# Altium PCB ESP32C3N.PcbDoc
Units mm, origin at the board's own origin, x right, y up, seen from the top; angles counter-clockwise.
Board outline 20 x 20 mm, 2 copper layers (Top Layer, Bottom Layer), stack 0.77 mm thick; 26 components, 22 nets, 95 pads, 37 vias.
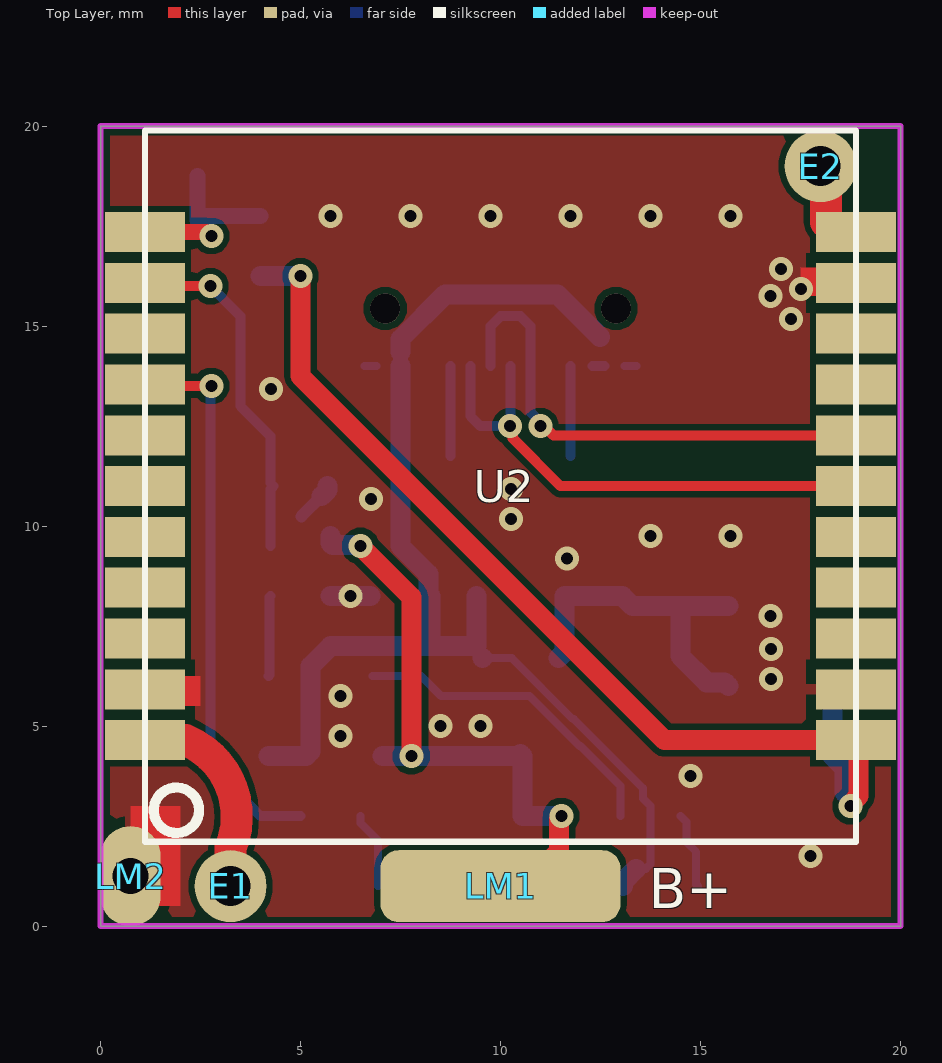
[diagram p0: Top Layer view]
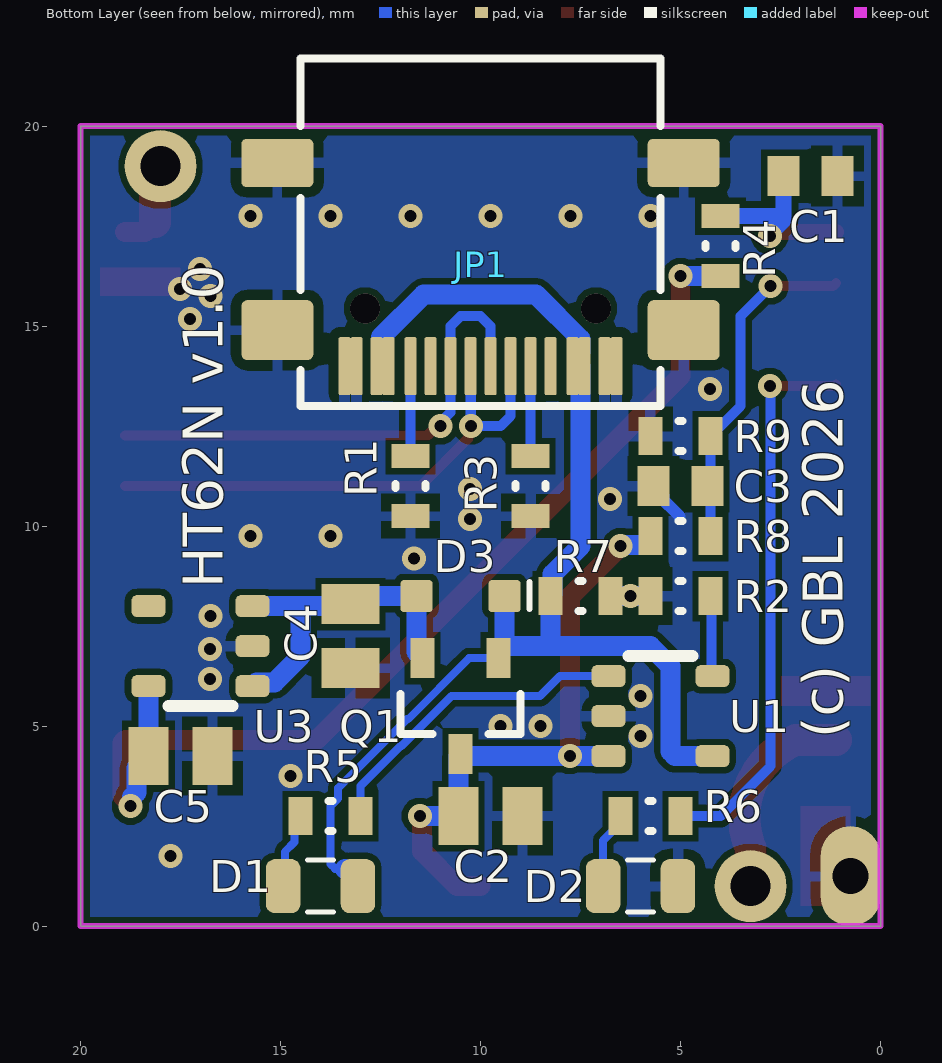
[diagram p1: Bottom Layer view, seen from below]

## Layer stack, top to bottom
Top Solder: solder mask 0.01, Solder Resist, Dk 3.5
Top Layer: signal copper 0.035
Dielectric 1: dielectric 0.7, FR-4, Dk 4.8
Bottom Layer: signal copper 0.035
Bottom Solder: solder mask 0.01, Solder Resist, Dk 3.5

## Board outline
0,0 0,20 20,20 20,0

## Design rules (kind name [scope] priority, off if disabled: settings)
Clearance Clearance_1 [InComponent('E1') vs OnLayer('Keep-Out Layer')] p1: gap=0 ignorepadtopadclearanceinfootprint=FALSE
Clearance [All] p2: gap=0.16 ignorepadtopadclearanceinfootprint=FALSE
ComponentClearance ComponentClearance_1 [InComponent('E1') vs InComponent('M1')] p1: gap=0 collisioncheckmode=3 verticalgap=0 showdistances=FALSE
ComponentClearance [All] p2: gap=0.254 collisioncheckmode=3 verticalgap=0.254 showdistances=FALSE
HoleSize [All] p1: absolutevalues=TRUE maxlimit=5 minlimit=0.025 maxpercent=80.000 minpercent=20.000
MinimumSolderMaskSliver [All] p1: minsoldermaskwidth=0.05
PolygonConnect PolygonConnect_1 [All vs IsNamedPolygon('GND_L01_P001') Or IsNamedPolygon('GND_L02_P000')] p1: thpad.connectstyle=Relief thpad.reliefconductorwidth=0.254 thpad.reliefentries=4 thpad.polygonreliefangle="90 Angle" thpad.airgapwidth=0.254 smdpad.connectstyle=Relief smdpad.reliefconductorwidth=0.254 smdpad.reliefentries=4 smdpad.polygonreliefangle="90 Angle" smdpad.airgapwidth=0.254 via.connectstyle=Direct via.reliefconductorwidth=0.254 via.reliefentries=4 via.polygonreliefangle="90 Angle" via.airgapwidth=0.254
PolygonConnect [All] p2: connectstyle=Relief reliefconductorwidth=0.254 reliefentries=4 polygonreliefangle="90 Angle" airgapwidth=0.254
RoutingVias [All] p1: holewidth=0.711 width=1.27 viastyle="Through Hole" minholewidth=0.711 minwidth=1.27 maxholewidth=0.711 maxwidth=1.27
SilkToSilkClearance [All] p1: silktosilkclearance=0.05
SilkToSolderMaskClearance [IsPad] p1: minsilkscreentomaskgap=0.05 clearancetoexposedcopper=TRUE
SolderMaskExpansion [All] p1: expansion=0 istentingtop=FALSE
SupplyNets "Schematic Supply Nets_3" [InNet('VBUS')] p1: voltage=0.000
SupplyNets "Schematic Supply Nets_2" [InNet('VCC')] p2: voltage=0.000
SupplyNets "Schematic Supply Nets_1" [InNet('GND')] p3: voltage=0.000
SupplyNets "Schematic Supply Nets" [InNet('V_BATT')] p4: voltage=0.000
Width [All] p1: maxlimit=1 minlimit=0.15 preferedwidth=0.2
25 further rules are at their usual default settings.

## Components (designator, comment, footprint, x,y, rotation, side; value= is the part's Value field where it differs from the comment)
C1 "100nF" C-0603 1.75,18.75 r0 bottom
C2 "10uF" C-0805 9.75,2.75 r180 bottom
C3 "CAPN" C-0603 5,11 r0 bottom
C4 "10uF" C-0805 13.25,7.25 r270 bottom
C5 "10uF" C-0805 17.5,4.25 r180 bottom
D1 "LED_1" LED_0805 14,1 r180 bottom
D2 "LED_1" LED_0805 6,1 r0 bottom
D3 "SS14" SOD-323 10.5,8.25 r0 bottom
E1 "SPRING" SPRING433 3.25,1 r180 top
E2 "SPRING" SPRING433 18,19 r0 top
JP1 "L-KLS1-5473" L-KLS1-5473 10,14 r0 bottom locked
LM1 "LAMELY" PAD2.5X4_SQUARE 10,1 r180 top
LM2 "LAMELY" PAD1 0.75,1.25 r0 top
Q1 "IRLML6401" SOT-23 10.5,5.5 r270 bottom
R1 "5k1" R-0603 11.75,11 r270 bottom
R2 "4k7" R-0603 5,8.25 r180 bottom
R3 "5k1" R-0603 8.75,11 r270 bottom
R4 "10k" R-0603 4,17 r90 bottom
R5 "1k" R-0603 13.75,2.75 r0 bottom
R6 "470" R-0603 5.75,2.75 r180 bottom
R7 "100k" R-0603 7.5,8.25 r0 bottom
R8 "100k" R-0603 5,9.75 r0 bottom
R9 "10k" R-0603 5,12.25 r180 bottom
U1 "STC4054GR" SOT-23-5 5.5,5.25 r180 bottom
U2 "HT-CT62" HT-CT62 10,11 r0 top locked
U3 "LP5907MFX-3.0" SOT-23-5 17,7 r0 bottom

## Footprints (in the part's own frame and the unit in brackets; to place one, negate y for a bottom-side part, rotate by r counter-clockwise, add the part's x,y. Pads: shape width x height; smd on the part's side, far side on the other; paste and mask are expansions set on the pad)
C-0603 [mm] "Chip Capacitor, 2-Leads, Body 1,60x0,80mm, IPC Medium Density"
  rect 0.8x1 smd: 1(-0.675,0) 2(0.675,0)
  body extent -0.8,-0.4 0.8,0.4, height 0.8
C-0805 [mm] "Chip Capacitor, 2-Leads, Body 2,00x1,25mm, IPC Medium Density"
  rect 1x1.45 smd: 1(-0.8,0) 2(0.8,0)
  body extent -1,-0.63 1,0.63, height 1.25
HT-CT62 [mm]
  rect 2x1 smd: 1(-8.89,-6.35) 2(-8.89,-5.08) 3(-8.89,-3.81) 4(-8.89,-2.54) 5(-8.89,-1.27) 6(-8.89,0) 7(-8.89,1.27) 8(-8.89,2.54) 9(-8.89,3.81) 10(-8.89,5.08) 11(-8.89,6.35) 12(8.89,-6.35) 13(8.89,-5.08) 14(8.89,-3.81) 15(8.89,-2.54) 16(8.89,-1.27) 17(8.89,0) 18(8.89,1.27) 19(8.89,2.54) 20(8.89,3.81) 21(8.89,5.08) 22(8.89,6.35)
  silkscreen extent -8.89,-8.89 8.89,8.89, body extent -8.89,-8.89 8.89,8.89, height 2.8
L-KLS1-5473 [mm] "USB 3.1 Type C"
  rrect20% 1.8x1.2 smd mask+0.07: 1(-5.08,-5.08) 1(5.08,-5.08)
  rrect20% 1.8x1.5 smd mask+0.07: 1(-5.08,-0.9) 1(5.08,-0.9)
  rrect30% 0.3x1.45 smd paste-2 mask+0.07: A1(-3.1,0) A4(-2.6,0) A9(2.6,0) A12(3.4,0) B1(3.1,0) B4(2.3,0) B9(-2.3,0) B12(-3.4,0)
  rrect30% 0.3x1.45 smd mask+0.07: A5(-1.25,0) A6(-0.25,0) A7(0.25,0) A8(1.25,0) B5(1.75,0) B6(0.75,0) B7(-0.75,0) B8(-1.75,0)
  round 0.75 hole 0.75 unplated paste-2539.97 mask+0.07: MH(-2.885,-1.44) MH(2.885,-1.44)
  silkscreen extent -4.5,-7.69 4.5,1, body extent -4.47,-7.7 4.47,0.2, height 3.2
LED_0805 [mm] "LED, Chip; 2.00 mm L X 1.25 mm W X 0.80 mm H body"
  rrect51% 0.86x1.35 smd: A(0.935,0) K(-0.935,0)
  silkscreen extent -0.33,-0.65 0.33,0.65, body extent -1,-0.63 1,0.63, height 0.25
PAD1 [mm]
  oval 1.5x2.5 hole 0.9: 1(0,0)
PAD2.5X4_SQUARE [mm]
  rrect50% 6x1.8 smd: 1(0,0)
R-0603 [mm] "Chip Resistor, 2-Leads, Body 1,60x0,82mm, IPC Medium Density"
  rect 0.6x0.95 smd: 1(-0.75,0) 2(0.75,0)
  silkscreen extent -0.05,-0.38 0.05,0.38, body extent -0.8,-0.4 0.8,0.4, height 0.45
SOD-323 [mm]
  rrect20% 0.8x0.8 smd mask+0.07: 1(-1.1,0) 2(1.1,0)
  silkscreen extent -1.73,-0.35 -1.73,0.33, body extent -1.3,-0.68 1.3,0.67, height 1.1
SOT-23 [mm]
  rect 1x0.6 smd: 1(-1.2,0.95) 2(-1.2,-0.95) 3(1.2,0)
  silkscreen extent -0.3,-1.5 0.7,1.5, body extent -1.25,-1.5 1.25,1.5, height 1.2
SOT-23-5 [mm]
  rrect50% 0.85x0.55 smd mask+0.06: 1(-1.3,1) 2(-1.3,0) 3(-1.3,-1) 4(1.3,-1) 5(1.3,1)
  silkscreen extent -0.8,1.5 0.8,1.5, body extent -1.4,-1.45 1.4,1.45, height 1.45
SPRING433 [mm]
  round 1.8 hole 1: 1(0,0)
  body extent -3.6,-0.4 3.52,51.8, height 6.52

## Part data
C1 C2 C4 C5: library part CAPN, Voltage=50V, Вид=Конденсатор, Точність/група=NP0
C3: Voltage=50V, Вид=Конденсатор, Точність/група=NP0
D3: library part DIODSH, Вид=Діод
E1 E2: library part ANT, Вид=Антена, Примітки=Пряма
LM1 LM2: "Lamely", Вид=Роз'єм
Q1: library part MOSF-P, Вид=Транзистор
R1 R2 R3 R4 R5 R6 R7 R8 R9: library part RES, Вид=Резистор, Точність/група=5%
U1: library part STC4054
U3: library part LP5907, "250mA Low-Dropout Regulator", Вид=Мікросхема
D1 D2: Вид=Світлодіод
JP1: Mounting  Method=SMD

## Via types
v1: diameter 0.6, hole 0.3, Top Layer to Bottom Layer, tented both sides, 37 vias

## Nets (pads, with @x,y where several pads share a name; then routed paths per layer and width w, separated by ;. In a path a pad name is that pad's centre, name@x,y a point inside that pad or via, vN(x,y) a via of type N, cw(c..) or ccw(c..) an arc to the next point about the centre after c; other vN are vias at no path point)
BATT_LEVEL: C3.1 R8.1 R9.2 U2.10 | length 8.9
  Top Layer w0.254: U2.10 1.19,16 v1(2.75,16)
  Bottom Layer w0.254: v1(2.75,16) 3.5,15.25 3.5,13 R9.2 4.25,11.075 C3.1 4.25,10.925 R8.1@4.25,9.5
DN: JP1.A7 JP1.B7 U2.17 | length 13.3
  Top Layer w0.254: v1(10.24,12.5) 10.306,12.434 10.306,12.194 11.5,11 U2.17
  Bottom Layer w0.254: JP1.B7 9.25,12.75 9.5,12.5 v1(10.24,12.5) 10.245,12.505 10.245,13.995 JP1.A7
DP: JP1.A6 JP1.B6 U2.18 | length 12.8
  Top Layer w0.254: v1(11,12.5) 11.092,12.5 11.322,12.27 U2.18
  Bottom Layer w0.254: JP1.A6 9.75,15 10,15.25 10.5,15.25 10.75,15 JP1.B6 10.75,12.844 11,12.594 v1(11,12.5)
EN: C1.2 R4.2 U2.11 | length 4.9
  Top Layer w0.4: U2.11 2.65,17.35 v1@2.75,17.25
  Bottom Layer w0.4: C1.2 2.425,17.65 ; v1(2.769,17.255) 2.769,17.306 2.425,17.65 ; R4.2 2.525,17.75 2.425,17.65
GND: C1.1 C2.2 C3.2 C4.2 C5.2 D2.K JP1.1 JP1.A1 JP1.A12 JP1.B1 JP1.B12 LM2.1 R1.2 R2.1 R3.2 R7.1 R9.1 U1.2 U2.2 U2.13 U2.21 U3.2 | length 2.6
  Bottom Layer w0.2: JP1.B12 JP1.A1 ; JP1.B1 JP1.A12
  Bottom Layer w0.3: 5.021,10.246 C3.2@5.525,10.75
  Bottom Layer w0.5: C3.2@5.525,10.75 5.675,10.9 C3.2 ; R2.1 R7.1
  other v1: 17.75,1.75 14.75,3.75 6,4.75 8.5,5 9.5,5 6,5.75 16.767,6.177 16.767,6.927 16.75,7.75 6.25,8.25 11.662,9.187 13.75,9.75 15.75,9.75 10.267,10.177 6.767,10.677 10.267,10.927 4.267,13.427 17.267,15.177 16.75,15.75 17.517,15.927 17.017,16.427 5.75,17.75 7.75,17.75 9.75,17.75 11.75,17.75 13.75,17.75 15.75,17.75
IO1: U2.9
IO9: U2.15
LED: R6.2 U2.8 | length 13.9
  Top Layer w0.254: U2.8 1.145,13.505 v1(2.769,13.505)
  Bottom Layer w0.254: v1@2.75,13.5 2.75,4 4,2.75 R6.2
NetC4_1: C4.1 D3.2 Q1.2 U3.1 U3.3 | length 8.6
  Bottom Layer w0.5: Q1.2 11.6,6.85 D3.2 13.05,8.25 13.3,8 14.617,8 ; U3.1 15.603,6.097 15.153,6.097 14.5,6.75 14.5,7.883 14.617,8 ; U3.3 14.617,8
NetD1_K: D1.K R5.2 | length 1.9
  Bottom Layer w0.2: R5.2 14.65,2.6 14.65,2.1 14.892,1.858 14.892,1.043 D1.K
NetD2_A: D2.A R6.1 | length 1.9
  Bottom Layer w0.2: R6.1 6.5,2.575 6.935,2.14 D2.A
NetE1_1: E1.1 U2.1 | length 5.2
  Top Layer w0.8: U2.1 1.71,4.65 2.125,4.65 cw(c1.337,2.737) 3.25,1.949 E1.1
NetE2_1: E2.1 U2.22 | length 2.3
  Top Layer w0.5: E2.1 E2.1@18.14,18.86 ; U2.22@18.14,17.6 18.39,17.35 U2.22
  Top Layer w0.8: U2.22@18.14,17.6 E2.1@18.14,18.86
NetJP1_A5: JP1.A5 R3.1 | length 2.2
  Bottom Layer w0.254: R3.1 JP1.A5
NetJP1_B5: JP1.B5 R1.1 | length 2.2
  Bottom Layer w0.254: R1.1 JP1.B5
NetR2_2: R2.2 U1.5 | length 2
  Bottom Layer w0.254: U1.5 4.225,6.275 4.225,8.225 R2.2
NetR5_1: R5.1 U1.1 | length 8.1
  Bottom Layer w0.2: U1.1 8.013,6.25 8.513,5.75 10.723,5.75 11.973,4.5 12,4.5 13,3.5 R5.1
RXD: U2.19
TXD: U2.20
V_BATT: C2.1 LM1.1 Q1.3 R8.2 U1.3 | length 15.4
  Top Layer w0.5: v1(6.5,9.5) 7.769,8.231 v1(7.769,4.255) ; LM1.1 10.59,1 11.46,1.87 11.46,2.695 v1(11.519,2.755)
  Bottom Layer w0.5: R8.2 5.75,9.575 5.8,9.525 6.448,9.525 6.473,9.5 v1(6.5,9.5) ; U1.3@7.05,4.25 10.45,4.25 Q1.3 10.55,4.25 C2.1 v1@11.5,2.75
VBUS: D1.A D3.1 JP1.A4 JP1.A9 JP1.B4 JP1.B9 Q1.1 R7.2 U1.4 | length 30.9
  Bottom Layer w0.2: Q1.1 10.282,6.7 11.808,5.175 11.835,5.175 13.56,3.449 13.56,3.19 13.75,3 13.75,1.55 13.633,1.433 D1.A@13.386,1.433
  Bottom Layer w0.25: JP1.B4 JP1.A9
  Bottom Layer w0.5: U1.4 5.133,4.25 5.25,4.367 5.25,6.5 5.75,7 8.25,7 ; JP1.A4@7.5,14 7.5,9.5 8.2,8.8 8.2,8.3 R7.2 8.25,7 ; JP1.A4@7.5,14.359 7.5,14.678 8.609,15.787 11.428,15.787 12.482,14.732 ; Q1.1@9.35,7 8.25,7 ; Q1.1@9.4,7 D3.1 ; D1.A 13.065,1.112 D1.A@13.386,1.433
VCC: C5.1 R4.1 U2.12 U3.5 | length 26.1
  Top Layer w0.5: v1(5,16.25) 5,13.75 14.1,4.65 U2.12 18.945,4.595 18.945,3.249 18.75,3.054 v1(18.75,3)
  Bottom Layer w0.5: R4.1 v1(5,16.25) ; U3.5 C5.1 18.6,3.95 18.6,3.346 18.712,3.234 18.712,3.038 v1(18.75,3)
pads on no net: JP1.A8 JP1.B8 JP1.MH U2.3 U2.4 U2.5 U2.6 U2.7 U2.14 U2.16 U3.4

## Polygon pours and split planes (outlines as drawn)
GND on Top Layer "GND_L01_P001" (solid, remove dead copper, pour order 1): -0.121,-0.065 19.935,-0.065 20,0 20,20 0,20
GND on Bottom Layer "GND_L02_P000" (solid, remove dead copper, pour order 0): 0,0 20,0 20,20 0,20

## Keep-outs
Keep-Out Layer:
  the board outline again, w0.15

## Other copper
Top Layer:
  rectangle net GND: 0.75,0.5 2,3
  rectangle net GND: 17.5,15.75 19.512,16.465
  rectangle net GND: 0.25,5.5 2.5,6.25

## Silkscreen, mask and mechanical layers (free items; w line width, h text height)
Top Overlay:
  text "B+" at 13.7,0.45 h1
Bottom Overlay:
  text "HT62N v1.0" at 16.45,8.45 h1 r270
  text "(c) GBL 2026" at 0.95,4.7 h1 r270